# Altium PCB Electrode_PCB_v4.0.3.PcbDoc
Units mil, origin at the board's own origin, x right, y up, seen from the top; angles counter-clockwise.
Board outline 510.49 x 1258.83 mil, 2 copper layers (Top Layer, Bottom Layer), stack 34 mil thick; 40 components, 29 nets, 104 pads, 31 vias.
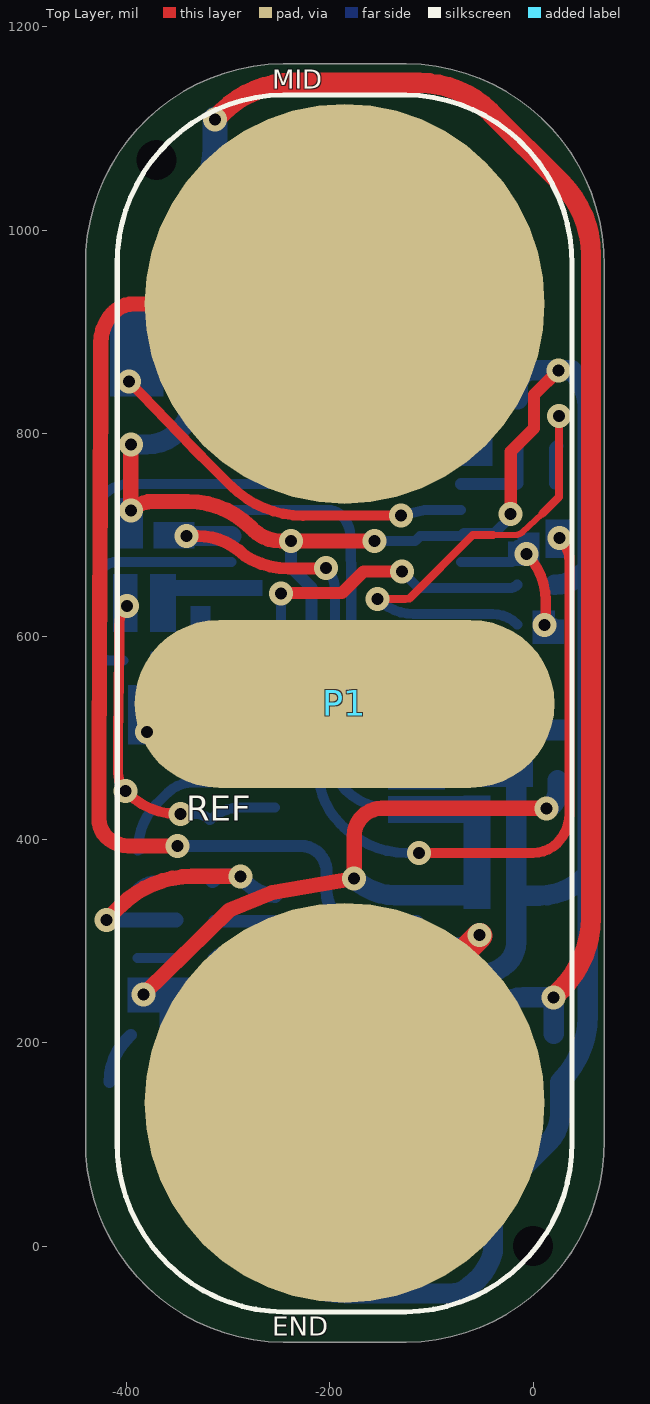
[diagram p0: Top Layer view]
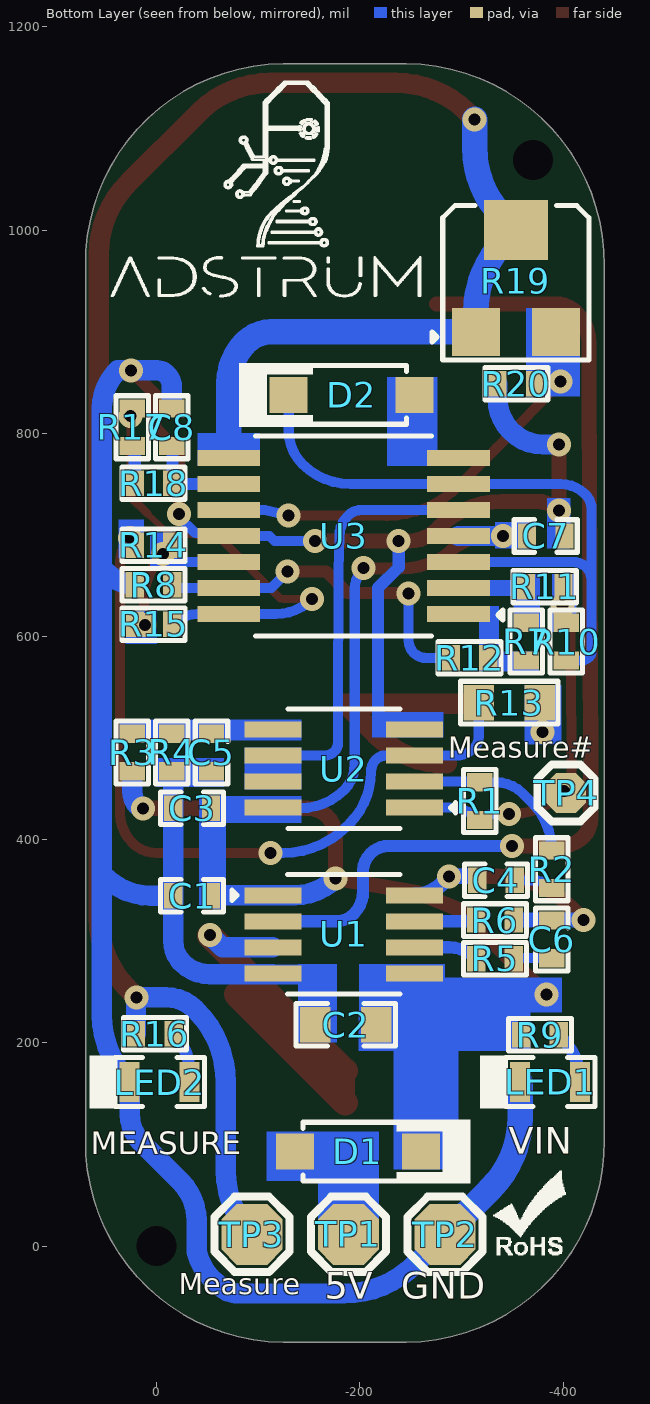
[diagram p1: Bottom Layer view, seen from below]
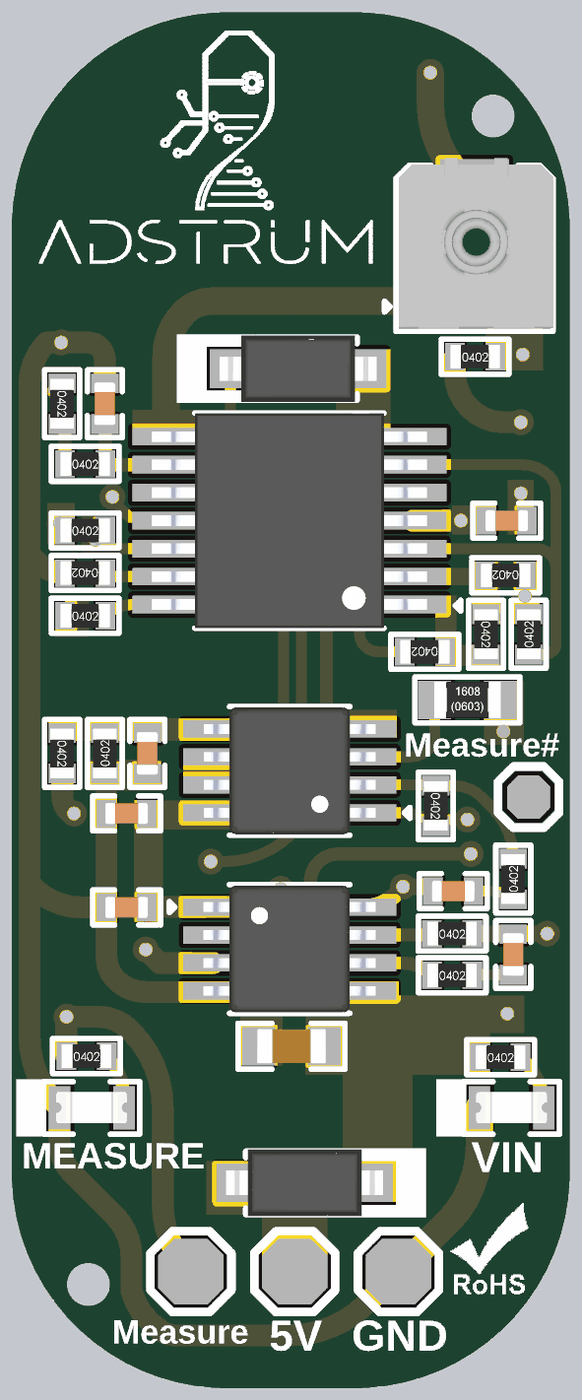
[diagram p2: 3D render of the assembled board from below, using the file's embedded part models]

## Layer stack, top to bottom
Top Solder: solder mask 3, Solder Resist, Dk 3.5
Top Layer: signal copper 9
Dielectric 1: dielectric 16, FR-4, Dk 4.8
Bottom Layer: signal copper 9
Bottom Solder: solder mask 3, Solder Resist, Dk 3.5

## Board outline
-440.49,104.27 ccw(c-243.65,102.06) -245.86,-94.78 -124.63,-94.78 ccw(c-126.84,102.06) 70,104.27 70,965 ccw(c-126.84,967.21) -124.63,1164.05 -245.86,1164.05 ccw(c-243.65,967.21) -440.49,965

## Design rules (kind name [scope] priority, off if disabled: settings)
Clearance [All] p1: gap=6 ignorepadtopadclearanceinfootprint=FALSE except(4: Arc-SMDPad Track-SMDPad SMDPad-SMDPad)
ComponentClearance [All] p1: gap=5 collisioncheckmode=3 verticalgap=5 showdistances=FALSE
HoleSize [All] p1: absolutevalues=TRUE maxlimit=1000 minlimit=1 maxpercent=80.000 minpercent=20.000
HoleToHoleClearance [All] p1: gap=0 allowstackedmicrovias=TRUE
MinimumSolderMaskSliver [All] p1: minsoldermaskwidth=0
PolygonConnect [All] p1: connectstyle=Relief reliefconductorwidth=10 reliefentries=4 polygonreliefangle="90 Angle" airgapwidth=10
RoutingVias [All] p1: holewidth=11.81 width=23.62 viastyle="Through Hole" minholewidth=11.81 minwidth=23.62 maxholewidth=31.5 maxwidth=62.99
SilkToSilkClearance [All] p1: silktosilkclearance=0
SilkToSolderMaskClearance [IsPad] p1: minsilkscreentomaskgap=0 clearancetoexposedcopper=TRUE
SolderMaskExpansion [All] p1: expansion=4 istentingtop=FALSE
UnRoutedNet [All] p1: checkbadconnections=TRUE
Width [All] p1: maxlimit=40 minlimit=6 preferedwidth=22 minimp=50.000000 maximp=50.000000 favimp=50.000000
23 further rules are at their usual default settings.

## Components (designator, comment, footprint, x,y, rotation, side; value= is the part's Value field where it differs from the comment)
C1 "0.1uF" Cap-0402 -35,345 r0 bottom locked
C2 "10uF" Cap-0603 -186,218 r0 bottom locked
C3 "0.1uF" Cap-0402 -35,431 r0 bottom locked
C4 "22nF" Cap-0402 -334,360 r180 bottom locked
C5 "0.1uF" Cap-0402 -54,486 r90 bottom locked
C6 "2.2nF" Cap-0402 -389,302 r270 bottom locked
C7 "0.1uF" Cap-0402 -383,699 r180 bottom locked
C8 "22nF" Cap-0402 -15,806 r90 bottom locked
D1 "1N4148W" SOD-123 -198,93 r180 bottom locked
D2 "1N4148W" SOD-123 -192,838 r0 bottom
LED1 "RED" LED-0603 -387.37,161.57 r0 bottom locked
LED2 "Emerald" LED-0603 -3,161.57 r0 bottom locked
P1 "SEMG Sensor" sEMG-sensor -185.49,534.27 r0 top locked
R1 "330K" Res-0402 -318,438 r270 bottom value=330kR
R2 "330K" Res-0402 -389,371 r90 bottom locked value=330kR
R3 "200K" Res-0402 24,486 r270 bottom locked
R4 "200K" Res-0402 -15,486 r90 bottom locked
R5 "1K" Res-0402 -333,283 r180 bottom locked
R6 "200K" Res-0402 -333,321 r180 bottom locked
R7 "10K" Res-0402 -364,595 r270 bottom locked
R8 "10K" Res-0402 3,651 r0 bottom locked
R9 "330R" Res-0402 -377.25,208 r180 bottom locked
R10 "10K" Res-0402 -403,595 r90 bottom locked
R11 "10K" Res-0402 -382,649 r0 bottom locked
R12 "10K" Res-0402 -308,579 r0 bottom locked
R13 "0.3R" Res-0603 -347,535 r0 bottom value=300mR
R14 "10K" Res-0402 3,690 r180 bottom locked
R15 "10K" Res-0402 3,612 r180 bottom locked
R16 "330R" Res-0402 1.75,209 r180 bottom locked
R17 "1M" Res-0402 24,806 r270 bottom locked value=1MR
R18 "1M" Res-0402 3,751 r180 bottom locked value=1MR
R19 "TC33X-2-104E" TC33X-2-104E_ -314.13,899.91 r180 bottom locked
R20 "1K" Res-0402 -354,849 r180 bottom locked
TP1 "TEST POINT" Test-point#1 -188.85,11.71 r180 bottom locked
TP2 "TEST POINT" Test-point#1 -283.85,11.71 r180 bottom locked
TP3 "TEST POINT" Test-point#1 -93.85,11.71 r180 bottom locked
TP4 "Test Point" Test-point#2 -403,446 r180 bottom
U1 "AD8237ARMZ-R7" MSOP-8 -184.18,307 r180 bottom locked
U2 "AD8617ARMZ-REEL" MSOP-8 -184.26,470 r0 bottom locked
U3 "AD8619ARUZ-REEL" 14-TSSOP -184,699 r0 bottom locked

## Footprints (in the part's own frame and the unit in brackets; to place one, negate y for a bottom-side part, rotate by r counter-clockwise, add the part's x,y. Pads: shape width x height; smd on the part's side, far side on the other; paste and mask are expansions set on the pad)
14-TSSOP [mm]
  rect 1.57x0.41 smd: 1(-2.87,1.95) 2(-2.87,1.3) 3(-2.87,0.65) 4(-2.87,0) 5(-2.87,-0.65) 6(-2.87,-1.3) 7(-2.87,-1.95) 8(2.87,-1.95) 9(2.87,-1.3) 10(2.87,-0.65) 11(2.87,0) 12(2.87,0.65) 13(2.87,1.3) 14(2.87,1.95)
  silkscreen extent -3.98,-2.5 2.2,2.5, body extent -3.2,-2.5 3.2,2.5, height 1.2
Cap-0402 [mil]
  rect 18x25 smd mask+2.36: 1(-18.5,0) 2(18.5,0)
  silkscreen extent -31,-16 31,16, body extent -20,-10 20,10, height 19
Cap-0603 [mil]
  rect 30x35 smd mask+2.36: 1(-30,0) 2(30,0)
  silkscreen extent -49,-21 49,21, body extent -32,-16 31,16, height 34
LED-0603 [mm]
  rect 0.5x1 smd: 1(-0.75,0) 2(0.75,0)
  silkscreen extent -1.12,-0.66 1.75,0.66, body extent -0.82,-0.37 0.82,0.36, height 0.68
MSOP-8 [mm]
  rect 1.42x0.4 smd: 1(-1.77,0.975) 2(-1.77,0.325) 3(-1.77,-0.325) 4(-1.77,-0.975) 5(1.77,-0.975) 6(1.77,-0.325) 7(1.77,0.325) 8(1.77,0.975)
  silkscreen extent -2.8,-1.5 1.4,1.5, body extent -2,-1.47 2,1.47, height 1.3
Res-0402 [mil]
  rect 18x25 smd mask+2.17: 1(-18.5,0) 2(18.5,0)
  silkscreen extent -32,-17 32,16, body extent -23,-11 23,11, height 16
Res-0603 [mil]
  rect 30x35 smd: 1(-30,0) 2(30,0)
  silkscreen extent -48,-21 48,21, body extent -31,-17 31,17, height 18
sEMG-sensor [mm]
  round 10 smd: 1(0,9.987) 2(0,-9.987)
  oval 10.5x4.2 smd: 3(0,-0.013)
  silkscreen extent -5.68,-15.21 5.68,15.21
SOD-123 [mm]
  rect 0.95x0.9 smd: 1(-1.575,0) 2(1.575,0)
  silkscreen extent -1.37,-0.8 2.82,0.8, body extent -1.82,-0.77 1.83,0.78, height 1.5
TC33X-2-104E_ [mm]
  rect 1.2x1.2 smd: 1(0,0) 3(2,0)
  rect 1.6x1.5 smd: 2(1,2.55)
  silkscreen extent -1.09,-0.71 2.83,3.15, body extent -0.76,-0.64 2.84,3.32, height 1.13
Test-point#1 [mil]
  oct 60x60 smd: 1(0,0)
  silkscreen extent -37,-37 37,37
Test-point#2 [mil]
  oct 39.37x39.37 smd: 1(0,0)
  silkscreen extent -28,-28 28,28

## Part data
C1 C3 C5 C7: library part C1005X5R1H104K050BB, "CAP CER 0.1UF 50V X5R 0402", Capacitance=100nF, Case Code (Imperial)=0402, Case Code (Metric)=1005, Dielectric=X5R, Dielectric Material=Ceramic, LCSC Part Number=C2181865, MANUFACTURER=TDK, Max Operating Temperature=85°C, Min Operating Temperature=-55°C, Package Quantity=1, Supplier Part Number 1=445-5942-1-ND, Tolerance=10%, Voltage=50V, Case/Package=0402, ComponentLink1Description=https://product.tdk.com/info/en/catalog/spec/mlccspec_commercial_general_midvoltage_en.pdf?src-supplier=Digi-Key, ComponentLink1URL=https://product.tdk.com/info/en/catalog/spec/mlccspec_commercial_general_midvoltage_en.pdf?src-supplier=Digi-Key, ComponentLink2Description=http://www.tdk.co.jp/tefe02/e413_c.pdf?src-supplier=Future+Electronics, ComponentLink2URL=http://www.tdk.co.jp/tefe02/e413_c.pdf?src-supplier=Future+Electronics, ComponentLink3Description=https://www.verical.com/server-webapp/html/getDatasheet?partID=743571&src-supplier=Verical, ComponentLink3URL=https://www.verical.com/server-webapp/html/getDatasheet?partID=743571&src-supplier=Verical, ComponentLink4Description=http://www.tdk.co.jp/tefe02/e412_c.pdf?src-supplier=Avnet+Europe, ComponentLink4URL=http://www.tdk.co.jp/tefe02/e412_c.pdf?src-supplier=Avnet+Europe, Construction=Flat, Depth=0.5mm, Height=0.5mm, Item Type=Capacitor, Lead Free="Lead Free", Length=1mm, Manufacturer Part Number=C1005X5R1H104K050BB, Mount="Surface Mount", Packaging="Tape and Reel", Pricing 1="1=0.12, 10=0.09, 50=0.049, 100=0.04, 500=0.02858, 1000=0.02245, 2500=0.02041, 5000=0.01878 (USD)", Radiation Hardening=No, REACH SVHC="No SVHC", Resistor Type=Ceramic, RoHS Compliant=Yes, Series=C, Stock 1=1455182, Supplier 1=Digi-Key, Termination=SMD/SMT, Thickness=0.022inch, Voltage Rating=50V, Voltage Rating (DC)=50V, Weight=2.3E-05oz, Width=0.02inch
C2: library part GRM188R6YA106MA73D, "10uF 35V X5R 20% Pad SMD 0603", Case Code (Imperial)=0603, Case Code (Metric)=1608, Dielectric=X5R, LCSC Part Number=C194427, MANUFACTURER=Murata, Max Operating Temperature=85°C, Min Operating Temperature=-55°C, Tolerance=20%, Voltage Rating=35V, Capacitance=10uF, Case/Package=0603, Category="Ceramic Capacitors", ComponentLink1Description=http://search.murata.co.jp/Ceramy/image/img/A01X/G101/ENG/GRM188R6YA106MA73-01.pdf?src-supplier=Future+Electronics, ComponentLink1URL=http://search.murata.co.jp/Ceramy/image/img/A01X/G101/ENG/GRM188R6YA106MA73-01.pdf?src-supplier=Future+Electronics, ComponentLink2Description=http://search.murata.co.jp/Ceramy/image/img/A01X/G101/ENG/GRM188R6YA106MA73-01.pdf?src-supplier=Digi-Key, ComponentLink2URL=http://search.murata.co.jp/Ceramy/image/img/A01X/G101/ENG/GRM188R6YA106MA73-01.pdf?src-supplier=Digi-Key, ComponentLink3Description=https://www.murata.com/~/media/webrenewal/support/library/catalog/products/capacitor/mlcc/c02e.ashx?la=en-us&src-supplier=Digi-Key, ComponentLink3URL=https://www.murata.com/~/media/webrenewal/support/library/catalog/products/capacitor/mlcc/c02e.ashx?la=en-us&src-supplier=Digi-Key, ComponentLink4Description=http://search.murata.co.jp/Ceramy/image/img/A01X/G101/ENG/GRM188R6YA106MA73-01.pdf?src-supplier=Mouser, ComponentLink4URL=http://search.murata.co.jp/Ceramy/image/img/A01X/G101/ENG/GRM188R6YA106MA73-01.pdf?src-supplier=Mouser, ComponentLink5Description=http://search.murata.co.jp/Ceramy/image/img/A01X/G101/ENG/GRM188R6YA106MA73-01.pdf?src-supplier=TTI, ComponentLink5URL=http://search.murata.co.jp/Ceramy/image/img/A01X/G101/ENG/GRM188R6YA106MA73-01.pdf?src-supplier=TTI, Length=0.063inch, Manufacturer Part Number=GRM188R6YA106MA73D, Mount="Surface Mount", Packaging="Tape and Reel", Pricing 1="1=0.36650, 10=0.23380, 25=0.23160, 100=0.15050, 250=0.14890, 500=0.10700, 1000=0.09270, 3000=0.08640, 6000=0.07720, 15000=0.07140, 30000=0.05840 (USD)", RoHS=Yes, RoHS Compliant=Yes, Stock 1=37601, Supplier 1="Arrow Electronics", Supplier Part Number 1=GRM188R6YA106MA73D, Thickness=0.039inch, Voltage Rating (DC)=35V, Width=0.031inch
C4: library part CC0402KRX5R7BB223, "CAP CER 0.022UF 16V X5R 0402", Case Code (Imperial)=0402, Case Code (Metric)=1005, Dielectric=X5R, LCSC Part Number=C541399, MANUFACTURER=Yageo, Max Operating Temperature=85°C, Min Operating Temperature=-55°C, Supplier Part Number 1=603-CC402KRX5R7BB223, Tolerance=10%, Voltage Rating=16V, Capacitance=22nF, Case/Package=0402, Category="Ceramic Capacitors", ComponentLink1Description=http://www.yageo.com/exep/pages/download/literatures/ProductSelectionGuide%202014_Final_2.pdf?src-supplier=Digi-Key, ComponentLink1URL=http://www.yageo.com/exep/pages/download/literatures/ProductSelectionGuide%202014_Final_2.pdf?src-supplier=Digi-Key, ComponentLink2Description=http://www.yageo.com/documents/recent/UPY-GPHC_X5R_4V-to-50V_25.pdf?src-supplier=Digi-Key, ComponentLink2URL=http://www.yageo.com/documents/recent/UPY-GPHC_X5R_4V-to-50V_25.pdf?src-supplier=Digi-Key, Halogen Free="Halogen Free", Lead Free="Lead Free", Length=0.039inch, Manufacturer Part Number=CC0402KRX5R7BB223, Mount="Surface Mount", Packaging="Tape and Reel", Pricing 1="1=0.10000, 10=0.05600, 50=0.05600, 100=0.02500, 1000=0.01400, 10000=0.01000 (USD)", RoHS=Yes, RoHS Compliant=Yes, Stock 1=31160, Supplier 1=Mouser, Thickness=0.022inch, Voltage Rating (DC)=16V, Width=0.02inch
C6: library part 04025C222JAT2A, "CAP CER 2.2nF 50V X7R ±5% 0402 MLCC - SMD/SMT ROHS", LCSC Part Number=C597041, MANUFACTURER="Kyocera AVX", Package=0402, ComponentLink1Description=LCSC, ComponentLink1URL=https://www.lcsc.com/product-detail/Multilayer-Ceramic-Capacitors-MLCC-SMD-SMT_Kyocera-AVX-04025C222JAT2A_C597041.html, Item Type=Capacitor, Manufacturer Part Number=04025C222JAT2A
C8: library part CC0402JRX7R7BB223, "CAP CER 0.022UF 16V X7R 0402", Case Code (Imperial)=0402, Case Code (Metric)=1005, Dielectric=X7R, LCSC Part Number=C541459, MANUFACTURER=Yageo, Max Operating Temperature=125°C, Min Operating Temperature=-55°C, Supplier Part Number=311-3758-1-ND, Tolerance=5%, Voltage Rating=16V, Case/Package=0402, Category="Ceramic Capacitors", ComponentLink1Description=https://datasheet.ciiva.com/13264/upy-gphc-x7r-6-3v-to-50v-8-12304-13264039.pdf?src-supplier=Mouser, ComponentLink1URL=https://datasheet.ciiva.com/13264/upy-gphc-x7r-6-3v-to-50v-8-12304-13264039.pdf?src-supplier=Mouser, Halogen Free=5694HalogenFree, Item Type=Capacitor, Lead Free=5697LeadFree, Length=0.039inch, Manufacturer Part Number=CC0402JRX7R7BB223, Mounting Technology="Surface Mount", Packaging="Tape and Reel", Pricing="1=0.1, 10=0.033, 50=0.0192, 100=0.0149, 500=0.0112, 1000=0.0088, 2500=0.008, 5000=0.00736 (USD)", RoHS=Yes, RoHS Compliant=Yes, Series=CC, Stock=4203, Supplier=Digikey, Termination=SMD/SMT, Thickness=0.022inch, Voltage Rating (DC)=16V, Weight=2.3E-05oz, Width=0.5mm
D1 D2: "100V 400mW Single 1.25V@150mA 8ns 300mA SOD-123 Switching Diode ROHS", LCSC Part Number=C917030, MANUFACTURER=JSMSEMI, Package=SOD-123, ComponentLink1Description=LCSC, ComponentLink1URL=https://www.lcsc.com/product-detail/Switching-Diode_JSMSEMI-1N4148W_C917030.html, Item Type=Diode, Manufacturer Part Number=1N4148W
LED1: library part NCD0603R3, "RED LED 0603 Light Emitting Diodes", LCSC Part Number=C3151730, MANUFACTURER="Foshan NationStar Optoelectronics", Package=0603, ComponentLink1Description=LCSC, ComponentLink1URL=https://www.lcsc.com/product-detail/Light-Emitting-Diodes-LED_Foshan-NationStar-Optoelectronics-NCD0603R3_C3151730.html, Item Type=LED, Manufacturer Part Number=NCD0603R3
LED2: library part NCD0603G2, "Emerald 0603 Light Emitting Diodes (LED) ROHS", LCSC Part Number=C87326, MANUFACTURER="Foshan NationStar Optoelectronics", Package=0603, ComponentLink1Description=LCSC, ComponentLink1URL=https://www.lcsc.com/product-detail/Light-Emitting-Diodes-LED_Foshan-NationStar-Optoelectronics-NCD0603G2_C87326.html, Item Type=LED, Manufacturer Part Number=NCD0603G2
P1: "Sensor Connecting Pads"
R1 R2: library part CRCW0402330KFKEDC, "RES 330K OHM 1% 1/16W 0402", Case/Package=0402, LCSC Part Number=C3009051, MANUFACTURER=Vishay, Power Rating=63mW, Supplier Part Number=71-CRCW0402330KFKEDC, Tolerance=1%, Category="Chip SMD Resistors", Item Type=Resistor, Lead Free="Lead Free", Manufacturer Part Number=CRCW0402330KFKEDC, Pricing="1=0.1, 10=0.017, 50=0.017, 100=0.008, 1000=0.005, 10000=0.004 (USD)", RoHS=Yes, RoHS Compliant=Yes, Stock=34154, Supplier=Mouser
R3 R4 R6: library part RC0402DR-07200KL, "RES 200K OHM 0.5% 1/16W 0402", Case/Package=0402, LCSC Part Number=C138077, MANUFACTURER=Yageo, Max Operating Temperature=155°C, Max Power Dissipation=63mW, Min Operating Temperature=-55°C, Resistance=200kR, Resistor Type="Thick Film", Supplier Part Number 1=603-RC0402DR-07200KL, Temperature Coefficient=100ppm/°C, Tolerance=0.5%, Category="Chip SMD Resistors", ComponentLink1Description=http://www.yageo.com.tw/exep/pages/download/literatures/PYu-R_INT-thick_7.pdf?src-supplier=Digi-Key, ComponentLink1URL=http://www.yageo.com.tw/exep/pages/download/literatures/PYu-R_INT-thick_7.pdf?src-supplier=Digi-Key, Features="Moisture Resistant", Height=0.016inch, Length=0.039inch, Manufacturer Part Number=RC0402DR-07200KL, Number of Terminations=2, Packaging="Tape and Reel", Pricing 1="1=0.13000, 10=0.07000, 50=0.07000, 100=0.02900, 1000=0.01300, 10000=0.00700 (USD)", RoHS=Yes, Supplier 1=Mouser, Width=0.02inch
R5 R20: library part RC0402FR-071KL, "RES 1K OHM 1% 1/16W 0402", Case Code (Imperial)=0402, Case Code (Metric)=1005, LCSC Part Number=C106235, MANUFACTURER=Yageo, Max Operating Temperature=155°C, Max Power Dissipation=63mW, Min Operating Temperature=-55°C, Power Rating=62.5mW, Resistance=1kR, Resistance Tolerance=1%, Resistor Type="Thick Film", Temperature Coefficient=100ppm/°C, Voltage Rating=50V, Case/Package=0402, Category="Chip SMD Resistors", ComponentLink1Description=https://datasheet.ciiva.com/11819/0900766b80c66297-11819477.pdf?src-supplier=RSComponents, ComponentLink1URL=https://datasheet.ciiva.com/11819/0900766b80c66297-11819477.pdf?src-supplier=RSComponents, ComponentLink2Description=https://datasheet.ciiva.com/7983/1018594-7983502.pdf?src-supplier=Element14, ComponentLink2URL=https://datasheet.ciiva.com/7983/1018594-7983502.pdf?src-supplier=Element14, ComponentLink3Description=https://datasheet.ciiva.com/22747/1018594-22747513.pdf?src-supplier=Element14, ComponentLink3URL=https://datasheet.ciiva.com/22747/1018594-22747513.pdf?src-supplier=Element14, ComponentLink4Description=https://datasheet.ciiva.com/12666/pyu-rc0402-51-rohs-l-6-r-12666741.pdf?src-supplier=Mouser, ComponentLink4URL=https://datasheet.ciiva.com/12666/pyu-rc0402-51-rohs-l-6-r-12666741.pdf?src-supplier=Mouser, ComponentLink5Description=https://datasheet.ciiva.com/7849/1018594-7849869.pdf?src-supplier=Element14, ComponentLink5URL=https://datasheet.ciiva.com/7849/1018594-7849869.pdf?src-supplier=Element14, ComponentLink6Description=https://datasheet.ciiva.com/7849/1018594-7849871.pdf?src-supplier=Element14, ComponentLink6URL=https://datasheet.ciiva.com/7849/1018594-7849871.pdf?src-supplier=Element14, ComponentLink7Description=https://datasheet.ciiva.com/17063/pyu-rc0402-51-rohs-l-6-r-17063193.pdf?src-supplier=Future+Electronics, ComponentLink7URL=https://datasheet.ciiva.com/17063/pyu-rc0402-51-rohs-l-6-r-17063193.pdf?src-supplier=Future+Electronics, Construction=Rectangular, Depth=0.5mm, Features="Moisture Resistant", Height=0.32mm, Item Type=Resistor, Lead Free="Lead Free", Length=1mm, Manufacturer Part Number=RC0402FR-071KL, Military Standard=Not, Number of Pins=2, Number of Terminations=2, Packaging="Tape and Reel", Pricing 1="10000=0.00085, 20000=0.00087, 40000=0.00084, 60000=0.00083, 80000=0.00079, 100000=0.00078, 1000000=0.00076 (USD)", Reach SVHC Compliant=Yes, RoHS=Yes, RoHS Compliant=Yes, Series=RC, Size Code=0402, Stock 1=13030000, Supplier 1=Avnet, Supplier Part Number 1=RC0402FR-071KL, Technology="THICK FILM", Termination=SMD/SMT, Tolerance=1%, Voltage Rating (DC)=50V, Width=0.5mm
R7 R8 R10 R11 R12 R14 R15: library part RC0402FR-0710KL, "RES 10K OHM 1% 1/16W 0402", Case Code (Imperial)=0402, Case Code (Metric)=1005, LCSC Part Number=C60490, MANUFACTURER=Yageo, Max Operating Temperature=155°C, Max Power Dissipation=63mW, Min Operating Temperature=-55°C, Power Rating=62.5mW, Resistance=10kR, Resistance Tolerance=1%, Resistor Type="Thick Film", Supplier Part Number 1=603-RC0402FR-0710KL, Temperature Coefficient=100ppm/°C, Voltage Rating=50V, Case/Package=0402, Category="Chip SMD Resistors", ComponentLink1Description=https://datasheet.ciiva.com/7660/38568-7660787.pdf?src-supplier=Element14, ComponentLink1URL=https://datasheet.ciiva.com/7660/38568-7660787.pdf?src-supplier=Element14, ComponentLink2Description=https://datasheet.ciiva.com/7849/1686128-7849814.pdf?src-supplier=Element14, ComponentLink2URL=https://datasheet.ciiva.com/7849/1686128-7849814.pdf?src-supplier=Element14, ComponentLink3Description=https://datasheet.ciiva.com/7983/1018594-7983486.pdf?src-supplier=Element14, ComponentLink3URL=https://datasheet.ciiva.com/7983/1018594-7983486.pdf?src-supplier=Element14, ComponentLink4Description=https://datasheet.ciiva.com/22747/1018594-22747512.pdf?src-supplier=Element14, ComponentLink4URL=https://datasheet.ciiva.com/22747/1018594-22747512.pdf?src-supplier=Element14, ComponentLink5Description=https://datasheet.ciiva.com/12667/pyu-rc0402-51-rohs-l-6-r-12667067.pdf?src-supplier=Mouser, ComponentLink5URL=https://datasheet.ciiva.com/12667/pyu-rc0402-51-rohs-l-6-r-12667067.pdf?src-supplier=Mouser, ComponentLink6Description=https://datasheet.ciiva.com/7849/1784430-7849813.pdf?src-supplier=Element14, ComponentLink6URL=https://datasheet.ciiva.com/7849/1784430-7849813.pdf?src-supplier=Element14, ComponentLink7Description=https://datasheet.ciiva.com/7849/1784430-7849815.pdf?src-supplier=Element14, ComponentLink7URL=https://datasheet.ciiva.com/7849/1784430-7849815.pdf?src-supplier=Element14, Construction=Rectangular, Depth=0.5mm, Features="Moisture Resistant", Height=0.32mm, Item Type=Resistor, Lead Free="Lead Free", Lead Pitch=0.2mm, Length=1mm, Manufacturer Part Number=RC0402FR-0710KL, Military Standard=Not, Number of Pins=2, Number of Terminations=2, Packaging="Tape and Reel", Pricing 1="1=0.10000, 10=0.01400, 50=0.01400, 100=0.00500, 1000=0.00300, 10000=0.00200 (USD)", REACH SVHC="No SVHC", RoHS=Yes, RoHS Compliant=Yes, Series=RC, Stock 1=18648329, Supplier 1=Mouser, Termination=SMD/SMT, Tolerance=1%, Voltage Rating (DC)=50V, Width=0.5mm, Working Voltage=50V
R9 R16: library part RC0402FR-070RL, "RES 0 OHM JUMPER 1/16W 0402", Case Code (Imperial)=0402, Case Code (Metric)=1005, LCSC Part Number=C106231, MANUFACTURER=Yageo, Max Operating Temperature=155°C, Max Power Dissipation=63mW, Min Operating Temperature=-55°C, Power Rating=62.5mW, Resistance=0R, Resistor Type="Thick Film", Supplier Part Number 1=603-RC0402FR-070RL, Temperature Coefficient=200ppm/°C, Tolerance=1%, Voltage Rating=50V, Case/Package=0402, ComponentLink1Description=https://datasheet.ciiva.com/8896/pyu-rc0402-51-rohs-l-6-8896149.pdf?src-supplier=Avnet, ComponentLink1URL=https://datasheet.ciiva.com/8896/pyu-rc0402-51-rohs-l-6-8896149.pdf?src-supplier=Avnet, ComponentLink2Description=https://datasheet.ciiva.com/16790/pyu-rc0402-51-rohs-l-6-r-16790444.pdf?src-supplier=Future+Electronics, ComponentLink2URL=https://datasheet.ciiva.com/16790/pyu-rc0402-51-rohs-l-6-r-16790444.pdf?src-supplier=Future+Electronics, Contact Plating=Tin,Matte, Features="Moisture Resistant", Height=0.35mm, Item Type=Resistors, Lead Free="Lead Free", Length=1mm, Manufacturer Part Number=RC0402FR-070RL, Mount="Surface Mount", Number of Terminations=2, Packaging="Tape and Reel", Pricing 1="1=0.10000, 10=0.01400, 50=0.01400, 100=0.00600, 1000=0.00300, 5000=0.00200, 10000=0.00100 (USD)", Radiation Hardening=No, RoHS=Yes, RoHS Compliant=Yes, Series=RC, Size Code=0402, Stock 1=8556842, Supplier 1=Mouser, Termination=SMD/SMT, Width=0.5mm
R13: library part RL0603FR-070R3L, "RES 0.3 OHM 1% 1/10W 0603", Case/Package=0603, MANUFACTURER=Yageo, Max Operating Temperature=155°C, Max Power Dissipation=100mW, Min Operating Temperature=-55°C, Supplier Part Number=13-RL0603FR-070R3LCT-ND, Temperature Coefficient=800ppm/°C, Tolerance=1%, ComponentLink1Description=http://www.mouser.com/ds/2/447/PYu-RL_521_RoHS_L_5-2927.pdf?src-supplier=Mouser, ComponentLink1URL=http://www.mouser.com/ds/2/447/PYu-RL_521_RoHS_L_5-2927.pdf?src-supplier=Mouser, ComponentLink2Description=http://www.yageo.com/documents/recent/PYu-RL_Group_521_RoHS_L_2.pdf?src-supplier=Digikey, ComponentLink2URL=http://www.yageo.com/documents/recent/PYu-RL_Group_521_RoHS_L_2.pdf?src-supplier=Digikey, Features="Moisture Resistant", Height=0.022inch, Item Type=Resistor, Length=0.063inch, Manufacturer Part Number=RL0603FR-070R3L, Number of Terminations=2, Packaging="Tape and Reel", Pricing="1=0.24, 10=0.125, 50=0.0854, 100=0.0736, 500=0.054, 1000=0.04784 (USD)", RoHS=Yes, RoHS Compliant=Yes, Series=RL, Stock=13643, Supplier=Digikey, Width=0.031inch
R17 R18: library part RC0402FR-071ML, "RES 1M OHM 1% 1/16W 0402", Case Code (Imperial)=0402, Case Code (Metric)=1005, LCSC Part Number=C138033, MANUFACTURER=Yageo, Max Operating Temperature=155°C, Max Power Dissipation=63mW, Min Operating Temperature=-55°C, Resistance Tolerance=1%, Resistor Type="Thick Film", Supplier Part Number=311-1.00MLRCT-ND, Temperature Coefficient=100ppm/°C, Voltage Rating=50V, Case/Package=0402, Category="Chip SMD Resistors", ComponentLink1Description=https://datasheet.ciiva.com/11808/0900766b80c66297-11808125.pdf?src-supplier=Rs, ComponentLink1URL=https://datasheet.ciiva.com/11808/0900766b80c66297-11808125.pdf?src-supplier=Rs, ComponentLink2Description=https://datasheet.ciiva.com/46394/1018594-46394951.pdf?src-supplier=Element14, ComponentLink2URL=https://datasheet.ciiva.com/46394/1018594-46394951.pdf?src-supplier=Element14, ComponentLink3Description=https://datasheet.ciiva.com/7849/1018594-7849883.pdf?src-supplier=Element14, ComponentLink3URL=https://datasheet.ciiva.com/7849/1018594-7849883.pdf?src-supplier=Element14, ComponentLink4Description=https://datasheet.ciiva.com/7849/1018594-7849882.pdf?src-supplier=Element14, ComponentLink4URL=https://datasheet.ciiva.com/7849/1018594-7849882.pdf?src-supplier=Element14, ComponentLink5Description=https://datasheet.ciiva.com/16741/pyu-rc0402-51-rohs-l-6-r-16741081.pdf?src-supplier=Future+Electronics, ComponentLink5URL=https://datasheet.ciiva.com/16741/pyu-rc0402-51-rohs-l-6-r-16741081.pdf?src-supplier=Future+Electronics, Construction=Rectangular, Depth=0.5mm, Features="Moisture Resistant", Height=0.32mm, Item Type=Resistor, Lead Free=5697LeadFree, Length=1mm, Manufacturer Part Number=RC0402FR-071ML, Military Standard=Not, Number of Terminations=2, Packaging="Tape and Reel", Power Rating=63mW, Pricing="1=0.1, 10=0.015, 50=0.0088, 100=0.0073, 500=0.00488, 1000=0.00417, 5000=0.00297 (USD)", Reach SVHC Compliant=Unknown, RoHS=Yes, RoHS Compliant=Yes, Series=RC, Stock=6516, Supplier=Digikey, Technology="THICK FILM", Termination=SMD/SMT, Tolerance=1%, Voltage Rating (AC)=50V
R19: "TRIMMER 100K OHM 0.1W J LEAD TOP", Color=Silver, LCSC Part Number=C719186, MANUFACTURER=Bourns, Max Operating Temperature=100°C, Max Power Dissipation=100mW, Min Operating Temperature=-40°C, Package Quantity=2500, Resistance=100kR, Resistance Tolerance=25%, Resistor Type=Carbon,Cermet, Temperature Coefficient=250ppm/°C, Voltage Rating (DC)=50V, Category="Variable Resistors and Potentiometers", ComponentLink1Description=https://datasheet.ciiva.com/11832/0900766b802749b3-11832506.pdf?src-supplier=RSComponents, ComponentLink1URL=https://datasheet.ciiva.com/11832/0900766b802749b3-11832506.pdf?src-supplier=RSComponents, ComponentLink2Description=https://datasheet.ciiva.com/8700/tc33-8700395.pdf?src-supplier=Avnet, ComponentLink2URL=https://datasheet.ciiva.com/8700/tc33-8700395.pdf?src-supplier=Avnet, ComponentLink3Description=https://datasheet.ciiva.com/2155/tc33-2155965.pdf?src-supplier=Digi-Key, ComponentLink3URL=https://datasheet.ciiva.com/2155/tc33-2155965.pdf?src-supplier=Digi-Key, ComponentLink4Description=https://datasheet.ciiva.com/7953/1818686-7953181.pdf?src-supplier=Element14, ComponentLink4URL=https://datasheet.ciiva.com/7953/1818686-7953181.pdf?src-supplier=Element14, ComponentLink5Description=https://datasheet.ciiva.com/16716/70155234-16716301.pdf?src-supplier=Allied+Electronics, ComponentLink5URL=https://datasheet.ciiva.com/16716/70155234-16716301.pdf?src-supplier=Allied+Electronics, ComponentLink6Description=https://datasheet.ciiva.com/2155/tc33-2155966.pdf?src-supplier=Digi-Key, ComponentLink6URL=https://datasheet.ciiva.com/2155/tc33-2155966.pdf?src-supplier=Digi-Key, ComponentLink7Description=https://datasheet.ciiva.com/7953/1818686-7953182.pdf?src-supplier=Element14, ComponentLink7URL=https://datasheet.ciiva.com/7953/1818686-7953182.pdf?src-supplier=Element14, ComponentLink8Description=https://datasheet.ciiva.com/2155/tc33-2155967.pdf?src-supplier=Digi-Key, ComponentLink8URL=https://datasheet.ciiva.com/2155/tc33-2155967.pdf?src-supplier=Digi-Key, Depth=3.8mm, Height=0.047inch, Item Type=Potentiometer, Length=3mm, Manufacturer Part Number=TC33X-2-104E, Military Standard=Not, Mount="Surface Mount", Number of Turns=1, Packaging="Tape and Reel", Power Rating=100mW, Pricing 1="2500=0.15500, 5000=0.13130 (USD)", Radiation Hardening=No, REACH SVHC="No SVHC", RoHS=Yes, RoHS Compliant=Yes, Series=TC33, Stock 1=12500, Supplier 1="Arrow Electronics", Supplier Part Number 1=TC33X-2-104E, Termination="Foot Print", Tolerance=25%, Weight=29.4mg, Width=0.118inch
TP1 TP2 TP3: "Test Point ON", Item Type="TEST POINT"
TP4: library part "TEST POINT", "Test Point ON", Item Type="TEST POINT"
U1: "IC INST AMP 1 CIRCUIT 8MSOP", LCSC Part Number=C12086, MANUFACTURER="Analog Devices", ComponentLink1Description=https://datasheet.ciiva.com/6626/ad8237-6626733.pdf?src-supplier=Digikey, ComponentLink1URL=https://datasheet.ciiva.com/6626/ad8237-6626733.pdf?src-supplier=Digikey, ComponentLink2Description=https://datasheet.ciiva.com/8582/ad8237-8582303.pdf?src-supplier=Avnet, ComponentLink2URL=https://datasheet.ciiva.com/8582/ad8237-8582303.pdf?src-supplier=Avnet, Item Type=IC, Manufacturer Part Number=AD8237ARMZ-R7, Pricing="1=2.88, 10=2.37, 50=2.37, 100=2.13, 1000=1.56, 10000=1.47 (USD)", RoHS=Yes, Stock=141226, Supplier=Mouser
U2: "IC CMOS 2 CIRCUIT 8MSOP", LCSC Part Number=C578787, MANUFACTURER="Analog Devices", ComponentLink1Description=https://datasheet.ciiva.com/1793/ad8613-8617-8619-1793776.pdf?src-supplier=Digikey, ComponentLink1URL=https://datasheet.ciiva.com/1793/ad8613-8617-8619-1793776.pdf?src-supplier=Digikey, ComponentLink2Description=https://datasheet.ciiva.com/1793/ad8613-8617-8619-1793777.pdf?src-supplier=Digikey, ComponentLink2URL=https://datasheet.ciiva.com/1793/ad8613-8617-8619-1793777.pdf?src-supplier=Digikey, ComponentLink3Description=https://datasheet.ciiva.com/1793/ad8613-8617-8619-1793778.pdf?src-supplier=Digikey, ComponentLink3URL=https://datasheet.ciiva.com/1793/ad8613-8617-8619-1793778.pdf?src-supplier=Digikey, Item Type=IC, Manufacturer Part Number=AD8617ARMZ-REEL, Pricing="1=2.71, 10=2.43, 50=2.43, 100=1.95, 1000=1.33, 10000=1.19 (USD)", RoHS=Yes, Stock=4553, Supplier=Mouser
U3: "IC CMOS 4 CIRCUIT 14TSSOP", Input Capacitance=2.5pF, LCSC Part Number=C653014, MANUFACTURER="Analog Devices", ComponentLink1Description=http://components.arrow.com/part/dataview/42367262S9299045N2771?src-supplier=Arrow+Electronics, ComponentLink1URL=http://components.arrow.com/part/dataview/42367262S9299045N2771?src-supplier=Arrow+Electronics, ComponentLink2Description=http://www.mouser.com/ds/2/609/AD8613_8617_8619-877840.pdf?src-supplier=Mouser, ComponentLink2URL=http://www.mouser.com/ds/2/609/AD8613_8617_8619-877840.pdf?src-supplier=Mouser, ComponentLink3Description=https://datasheet.octopart.com/AD8619ARUZ-REEL-Analog-Devices-datasheet-62341446.pdf?src-supplier=Element14, ComponentLink3URL=https://datasheet.octopart.com/AD8619ARUZ-REEL-Analog-Devices-datasheet-62341446.pdf?src-supplier=Element14, ComponentLink4Description=http://www.analog.com/static/imported-files/data_sheets/AD8613_8617_8619.pdf?src-supplier=Avnet, ComponentLink4URL=http://www.analog.com/static/imported-files/data_sheets/AD8613_8617_8619.pdf?src-supplier=Avnet, ComponentLink5Description=http://www.analog.com/media/en/technical-documentation/data-sheets/AD8613_8617_8619.pdf?src-supplier=Digikey, ComponentLink5URL=http://www.analog.com/media/en/technical-documentation/data-sheets/AD8613_8617_8619.pdf?src-supplier=Digikey, Item Type=Opam, Lead Free=5698LeadFree, Manufacturer Part Number=AD8619ARUZ-REEL, Pricing="1=3.67, 10=3.12, 50=3.12, 100=2.7, 1000=1.94, 10000=1.84 (USD)", RoHS=Yes, Stock=2210, Supplier=Mouser

## Free pads (board coordinates)
  round 0 hole 39.37 unplated: MH1(-370.49,1069.27) MH2(0,0)

## Via types
v1: diameter 23.62, hole 11.81, Top Layer to Bottom Layer, tented both sides, 30 vias
v2: diameter 23.62, hole 11.81, Top Layer to Bottom Layer, 1 vias

## Nets (pads, with @x,y where several pads share a name; then routed paths per layer and width w, separated by ;. In a path a pad name is that pad's centre, name@x,y a point inside that pad or via, vN(x,y) a via of type N, cw(c..) or ccw(c..) an arc to the next point about the centre after c; other vN are vias at no path point)
+5V: C1.1 C2.1 C3.1 C7.1 D1.2 R3.2 R9.1 U1.1 U1.5 U2.8 U3.4 | length 1164.5
  Top Layer w12: v1(-341.01,699) -330.31,699 cw(c-330.31,633.54) -296.01,689.29 cw(c-330.31,633.54) -284.02,679.83 ccw(c-240.5,747.25) -240.5,667 -203.89,667 v1(-203.61,667.28)
  Top Layer w15: v1(-383.56,247.82) -298.66,330.77 -256.59,348.03 v1(-176,362) -176,403.69 cw(c-148.69,403.69) -168,423 cw(c-148.69,403.69) -148.69,431 v1@14.19,431
  Bottom Layer w10: v1(-203.61,667.28) cw(c-224.39,646.5) -195,646.5 -195,474.05 ccw(c-159.67,474.05) -184.69,449.1 ccw(c-141.04,492.67) -140.98,431 U2.8@-113.09,431
  Bottom Layer w20: C7.1@-358.67,699 v1(-341.01,699) U3.4 ; v1(-176,362) ccw(c-135.89,402.11) -135.89,345.39 U1.1 C1.1@-62.5,345.39 ; v1@13.3,430.67 ccw(c8.47,444.87) 22.57,439.75 ccw(c0.1,447.9) 24,447.9 R3.2@24,458.5
  Bottom Layer w25: v1(-383.56,247.82) cw(c-383.56,229.56) -372.38,244 cw(c-383.56,229.56) -370.65,242.47
  other v1: 13.19,431
E: P1.2 U1.3 | length 438.5
  Top Layer w20: P1.2 P1.2@-185.49,172.51 ; v1@-52.49,305.51 v1(-52.49,306.49)
  Top Layer w25: P1.2 P1.2@-78.77,247.79 ; P1.2@-185.49,172.51 v1@-52.49,305.51
  Bottom Layer w20: U1.3 -64.77,294.2 v1(-52.49,306.49)
ENV: R16.1 R19.1 R19.2 TP3.1 U3.8 | length 2113.5
  Top Layer w20: v1(-313,1109) -306.29,1115.71 cw(c-235.58,1045) -235.58,1145 -112.1,1145 cw(c-112.1,1045) -41.39,1115.71 27.71,1046.61 cw(c-43,975.9) 57,975.9 57,323.42 cw(c-43,323.42) 27.71,252.71 v1(20,245)
  Bottom Layer w20: R19.2@-354.35,1001.51 R19.2@-334.77,1019.83 ; R19.2 R19.2@-343.42,990.22 ; R19.1 R19.1@-314.13,919.51 ; TP3.1 ccw(c-156.25,74.12) -68,74.12 -68,161.58 cw(c32,161.58) -38.71,232.29 -38,233 cw(c-9.03,204.03) -9.03,245 v1@19.02,245 ; R16.1 v1@20.25,245
  Bottom Layer w25: R19.2@-343.42,990.22 cw(c-414.13,919.51) R19.1@-314.13,919.51 ; R19.2@-334.77,1019.83 ccw(c-410.64,1081.29) -313,1081.29 v1(-313,1109) ; R19.1 -112.57,899.91 cw(c-112.57,864.92) -87.82,889.66 cw(c-128.41,849.07) -71.01,849.07 -71.01,783.84
GND: C1.2 C2.2 C3.2 C5.1 C7.2 C8.2 LED1.2 LED2.2 R4.1 R8.2 R20.1 TP2.1 U1.4 U2.4 U3.11 | length 2813.4
  Top Layer w12: -277.32,707.07 -275.54,705.29 ; v1@-248.28,694 v1(-238.23,694) ; v1(-22,720.69) -22,782.12 1,805.12 1,837.97 ccw(c-185.49,927.46) 1.03,838.03 v1(25,862)
  Top Layer w15: v1(-395.93,789) v1(-395.93,724) cw(c-374.2,702.27) -374.2,733 -339.92,733 cw(c-339.92,644.47) -277.32,707.07 ; -275.54,705.29 ccw(c-248.28,732.54) v1@-248.28,694 ; v1(-238.23,694) v1(-156,694)
  Bottom Layer w10: v1(-156,694) -116.02,694 -111.06,698.96 -71.05,698.96 U3.11 -67.94,702.07 -37.66,702.07 -22,717.73 v1(-22,720.69)
  Bottom Layer w12: U2.4@-253.56,508 U2.4 -245.61,508.39 -237.29,508.39 -233.86,508.39 -218,524.25 -218,648 -238.23,668.23 v1(-238.23,694)
  Bottom Layer w20: v1@-389,789 -380.38,789 ccw(c-380.38,833.38) -349,802 ccw(c-381.59,834.59) -335.5,834.59 R20.1 ; TP2.1 -254.86,-17.27 ccw(c-184.15,53.44) -184.15,-46.56 -79.8,-46.56 ccw(c-79.8,-22.85) -77.23,-46.42 ccw(c-79.8,-22.85) -63.03,-39.62 ccw(c-93.27,5.27) -55,-33 ccw(c-97.05,9.05) -39.43,-5.65 -39.43,24.88 cw(c15.63,24.88) -23.3,63.81 14.94,102.06 ccw(c-13.03,130.03) 26.53,130.03 LED2.2 ccw(c-39.8,227.9) 54,227.9 54,366.67 ; U1.4@-114.5,267.61 -52.49,267.61 ccw(c-52.49,306.49) -25,279 ccw(c-45.52,299.52) -16.5,299.52 ; C5.1 R4.1 ccw(c-11.38,463.88) -16.5,463.91 C3.2 C1.2 ; -16.5,300.52 C1.2 ; -15,833.5 -15,845.93 cw(c2.07,845.93) -10,858 cw(c-0.34,848.34) -0.34,862 v1(25,862) 38.26,862 ; R8.2 ccw(c21.5,688.81) 48.24,662.07 54,667.84 ; 39.89,860.3 cw(c0.27,824.01) 54,824.01 54,667.84 ; C1.2 5.64,345 ccw(c5.64,409.44) 51.21,363.87 54,366.67 ; 54,366.67 54,667.84
  Bottom Layer w25: LED1.2 -357.84,127.13 ccw(c-257.84,127.13) -328.55,56.42 TP2.1
M: P1.1 U1.2 | length 1020.4
  Top Layer w15: v1(-350,394) -398.27,394 cw(c-398.27,424.73) -420,403 cw(c-402.35,420.65) -427.31,420.65 -427.31,475.2 -425.49,845.95 -425.49,888.85 cw(c-382.85,888.85) -413,919 cw(c-392.57,898.57) -392.57,927.46 P1.1@-275.36,927.46
  Bottom Layer w12: v1(-350,394) -228.59,394 cw(c-228.59,368.54) -203.24,370.85 -203.24,349.3 ccw(c-171.7,349.3) -194,327 ccw(c-176.61,344.39) -176.61,319.8 U1.2
NetC4_2: C4.2 R2.1 | length 38.5
  Bottom Layer w10: R2.1 cw(c-370.89,334.39) -370.89,360 C4.2
NetC5_2: C5.2 R3.1 R4.2 U2.5 | length 88.4
  Bottom Layer w12: C5.2@-63.38,508.39 cw(c-63.38,495.12) C5.2 R4.2 R3.1
NetC6_2: C6.2 R5.2 | length 37.6
  Bottom Layer w10: C6.2 -352.71,283.5 cw(c-352.71,281.79) R5.2
NetC8_1: C8.1 R18.2 U3.9 | length 92.4
  Bottom Layer w12: U3.9 -17.48,750.18 ccw(c-17.48,752.98) R18.2 -15.5,786.29 cw(c-13.79,786.29) C8.1
NetD1_1: D1.1 TP1.1 | length 118.9
  Bottom Layer w40: TP1.1 -188.85,52.57 cw(c-141.57,52.57) -175,86 cw(c-158.1,69.1) -158.1,93 D1.1
NetD2_1: D2.1 U3.7
NetD2_2: D2.2 R10.1 U3.3 U3.6 | length 683.2
  Bottom Layer w10: R10.1 -417.55,576.5 cw(c-417.55,588.45) -426,580 cw(c-421.17,584.83) -428,584.83 -428,655.93 ; U3.3 -409.94,673.41 ccw(c-409.94,654.94) -423,668 ccw(c-410.93,655.93) -428,655.93 ; -143.68,769.68 ccw(c-176.71,802.71) -129.99,802.71 D2.2@-129.99,836 ; -143.68,769.68 cw(c-190.74,816.74) -190.74,750.18 U3.6 -397.42,750.18 ccw(c-397.42,715.42) -422,740 ccw(c-407.51,725.51) -428,725.51 -428,655.93
NetLED1_1: LED1.1 R9.2 | length 52.6
  Bottom Layer w12: LED1.1 cw(c-355.88,161.57) R9.2@-399.03,204.72 ; R9.2@-399.03,204.72 R9.2
NetLED2_1: LED2.1 R16.2 | length 51.6
  Bottom Layer w12: LED2.1 -32.53,170.91 cw(c21.34,170.91) R16.2
NetR1_1: R1.1 R2.2 U2.2 | length 189.9
  Bottom Layer w10: R2.2@-385.68,393.5 -381.5,393.5 R2.2 cw(c-322.98,389.5) -388.88,393.5 cw(c-322.98,389.5) -388.87,393.6 cw(c-322.98,389.5) -369.69,436.16 ; -369.66,436.19 -359.77,446.07 cw(c-334.6,420.9) -350.52,452.74 cw(c-334.6,420.9) -334.6,456.5 R1.1@-320.63,456.5 ; R1.1 R1.1@-320.63,456.5 ; U2.2 -318,457.2 -318.18,457.16 R1.1@-320.63,456.5
NetR5_1: R5.1 U1.6 | length 63.6
  Bottom Layer w12: R5.1 cw(c-287.45,255.95) -287.45,294.2 U1.6
NetR6_1: R6.1 U1.7 | length 61
  Bottom Layer w10: R6.1 ccw(c-311.59,323.91) R6.1@-311.59,319.8
  Bottom Layer w12: R6.1@-311.59,319.8 U1.7
NetR7_1: R7.1 R11.2 U3.2 | length 101.3
  Bottom Layer w10: R7.1 R11.2@-364,647.79 ; R11.2@-363.97,647.82 U3.2
NetR7_2: R7.2 R12.1 U3.1 | length 6.7
  Bottom Layer w10: R12.1@-332.54,576.5 ccw(c-332.54,585.04) R12.1
NetR8_1: R8.1 R12.2 U3.13 | length 346.6
  Top Layer w12: v1(-248.06,642.6) -247.67,643 -188,643 -167,664 v1@-129.16,664
  Bottom Layer w10: R12.2 -265.07,579 ccw(c-265.07,596.07) -253,584 ccw(c-264.92,595.92) -248.06,595.92 v1(-248.06,642.6) ; v1(-129,664) -112.82,647.82 -23.18,647.82 ccw(c-23.18,658.68) R8.1
NetR14_2: R14.2 R15.1 U3.12 | length 155.3
  Top Layer w10: v1(-6.52,681.31) cw(c-52.48,635.35) 12.52,635.33 v1@12.52,611.5
  Bottom Layer w10: U3.12 -20.59,673.41 -15.5,678.5 R14.2@-15.5,686.5 ; R14.2 R14.2@-15.5,686.5 ; R14.2@-8.52,681.31 R14.2@-15.5,686.5 ; R15.1@20,614 21.5,612.5 R15.1
  other v1: 11.52,611.5
NetR17_2: R17.2 R18.1 | length 37.5
  Bottom Layer w12: R18.1 21.5,785 R17.2
NetR19_3: R19.3 R20.2 U3.10 | length 380
  Top Layer w10: v1(-397.57,851) -335.53,786.53 cw(c-342.74,779.6) -335.49,786.49 -335.44,786.43 ccw(c-185.49,927.46) -326.6,777.59 ; -326.57,777.56 ccw(c-185.49,927.46) -326.51,777.5 ; -326.49,777.49 cw(c-333.36,770.22) -326.31,777.32 -297.29,748.29 ccw(c-226.58,819) -226.58,719 v1(-130.04,719.1)
  Bottom Layer w10: R19.3@-392.87,898.17 R19.3 ; v1(-130.04,719.1) -106.52,724.59 U3.10
"OUT B": U2.6 U2.7 U3.5 | length 434.7
  Bottom Layer w10: U3.5 -201.75,724.59 cw(c-201.75,705.5) -188.25,719 cw(c-208.45,698.8) -179.89,698.8 -179,665.3 -178.5,527.15 -178.5,495.52 ccw(c-166.36,495.52) -178.38,493.81 ccw(c-166.36,495.52) -178.04,492.24 ccw(c-166.36,495.52) -174.94,486.94 ccw(c-164.85,497.15) -164.85,482.8 U2.6 cw(c-116.49,484.72) U2.6@-116.49,482
  Bottom Layer w12: U2.7 U2.6
RAW-OUTPUT: R1.2 R10.2 R11.1 TP4.1 U2.1 | length 381.4
  Top Layer w10: v1(-399.64,630.02) ccw(c-381.16,611.54) -406.9,616.06 ccw(c-381.16,611.54) -407.29,611.54 -407.29,587.01 -408.47,500.6 -408.47,466.02 ccw(c-382.98,466.02) v2(-401,448) -398.65,445.65 ccw(c-350,494.31) v1@-350,425.5
  Bottom Layer w10: R10.2 ccw(c-409.04,619.54) -400.5,619.54 v1@-400.5,630.02 ; R11.1 v1@-400.5,630.02 ; v1(-399.64,630.02) v1@-400.5,630.02 ; v1@-349.99,425.5 -332.49,425.5 cw(c-332.49,405.01) -318.2,419.7 cw(c-332.49,405.01) R1.2 cw(c-288.75,390.25) -288.75,431.61 U2.1
  other v1: -346.99,425.47
RECT: R15.2 R17.1 U3.14 | length 454.3
  Top Layer w6: -39.4,699.88 -18.54,699.88 ccw(c-18.54,715.76) -18.43,699.88 ccw(c-18.54,715.76) -15.95,700.09 ccw(c-16.96,706.01) -14.65,700.47 cw(c-6.52,681.31) -12.74,701.17 ccw(c-14.58,706.88) -10.5,702.49 9.14,720.98
  Top Layer w8: v1(-153,637) -129.94,637 ccw(c-129.94,701.49) -121.69,637.53 -59.34,699.88 -39.4,699.88 ; 9.14,720.98 25.6,737.44 v1(25.6,817.31)
  Bottom Layer w8: R17.1 24,815.71 v1(25.6,817.31)
  Bottom Layer w10: v1(-153,637) ccw(c-117.34,672.66) -117.34,622.23 U3.14 -40.19,622.23 cw(c-40.19,587.31) R15.2
REF: P1.3 R13.1 | length 251.7
  Top Layer w20: P1.3@-316.98,533.76 P1.3 -214.96,504.29 cw(c-285.67,575) P1.3@-285.67,475
  other v1: -380,506
REF#: R13.2 R14.1 U2.3 | length 758.6
  Top Layer w10: v1(-112,387) -0.14,387 ccw(c-0.14,421.14) 24,397 ccw(c-4.97,425.97) 36,425.97 36,673.31 ccw(c2.5,673.31) v1(26.19,697)
  Bottom Layer w10: R13.2@-318,532.59 cw(c-314.59,532.59) R13.2 -317,501.07 ccw(c-301.98,501.07) -312.6,490.45 ccw(c-294.13,508.92) -294.13,482.8 U2.3 -225.16,482.8 cw(c-225.16,469.84) -216,479 cw(c-228.07,466.93) -211,466.93 ccw(c-138.75,466.93) -189.84,415.84 -187,413 ccw(c-124.23,475.77) -124.23,387 v1(-112,387) ; R14.1 cw(c25.12,690) 22.56,692.56 27,697 v1(26.19,697)
VOUT: C4.1 C6.1 R6.2 U1.8 | length 283.1
  Top Layer w15: v1(-420,321) -406.29,334.71 cw(c-335.58,264) -335.58,364 v1(-288,364)
  Bottom Layer w10: C6.1@-390.21,321 cw(c-390.21,319.29) C6.1 cw(c-387.79,319.29) C6.1@-387.79,321
  Bottom Layer w15: v1(-420,321) C6.1@-390.21,321 ; C6.1@-387.79,321 R6.2 ; C4.1 cw(c-305.84,350.34) -305.84,364 v1(-288,364) -280.36,356.36 ccw(c-253.87,382.86) -259.17,345.76 U1.8

## Other copper
Bottom Layer:
  region net NetD1_1: -108,64 -108,112.72 -175,112.72 -175,64
  rectangle net NetD1_1: -218.85,-3.29 -158.85,113
  rectangle net GND: -282.25,500.51 -212,526
  region net REF: -362,494 -362,552.5 -398.5,552.5 -398.5,494
  region net +5V: -41.89,331.83 -41.89,443.5 -68.39,443.5 -68.39,331.83
  rectangle net +5V: -142.52,416.5 -42.04,443
  rectangle net +5V: -297,75.28 -233,212
  rectangle net +5V: -373.5,686.5 -333.01,713
  rectangle net GND: -407.5,686.5 -384,736.5
  rectangle net +5V: -367.75,192 -198.75,232
  rectangle net +5V: -399,230 -263.79,264.5
  rectangle net GND: -66.5,451.9 0.1,480.5
  rectangle net NetC5_2: -142.52,497.5 36.5,518.26
  rectangle net REF#: 12.5,677.5 37.5,715
  region net NetR14_2: 30.5,616.69 -0.5,616.69 -0.5,592.69 30.5,592.69
  region net NetR14_2: 21.5,625.69 -0.5,625.69 -0.5,613.19 21.5,613.19
  rectangle net NetR14_2: -15.5,690 6.5,702.5
  rectangle net NetR14_2: -24.5,669.5 6.5,693.5
  region net GND: -139,277.5 -177.66,277.5 -177.66,200.5 -139,200.5
  region net +5V: -199,277.5 -284,277.5 -284,200.5 -199,200.5
  region net +5V: -199.36,257.78 -199.36,277.28 -283.37,277.28 -283.37,257.78
  region net GND: -85,257.78 -85,277.28 -169,277.28 -169,257.78
  rectangle net ENV: -101.91,767.7 -40.1,800.22
  region net NetD2_1: -226.51,855.72 -276.48,855.72 -276.48,767.7 -226.51,767.7
  region net NetR7_1: -266.09,639.75 -266.09,655.89 -360.09,655.89 -360.09,639.75
  region net NetR7_1: -351.24,661.5 -377.24,661.5 -377.24,604.5 -351.24,604.5
  region net RAW-OUTPUT: -389.24,661.5 -413.24,661.5 -413.24,604.5 -389.24,604.5
  region net NetR7_2: -317.5,565.87 -317.5,585.37 -376.5,585.37 -376.5,565.87
  rectangle net NetR7_2: -337,566.5 -317.5,630.3
  rectangle net "OUT B": -142.52,449.33 -86.62,490.67
  rectangle net NetR19_3: -416.49,836.5 -363.5,923.53

## Silkscreen, mask and mechanical layers (free items; w line width, h text height)
Top Overlay:
  text "MID" at -256.5,1132.98 h32
  text "REF" at -341.25,410.54 h42
  text "END" at -256.5,-94.48 h32
Bottom Overlay:
  drawing of 2573 lines, arcs and shapes, not listed
  text "Measure#" at -287,474 h35
  text "MEASURE" at 64.97,83.16 h38
  text "VIN" at -346.64,82.16 h45
  text "Measure" at -21.62,-54 h35
  text "GND" at -241,-60.46 h45
  text "5V" at -165.5,-60.46 h45
Board Outline:
  lines w10: -440.49,104.27 ccw(c-243.65,102.06) -245.86,-94.78 -124.63,-94.78 ccw(c-126.84,102.06) 70,104.27 70,965 ccw(c-126.84,967.21) -124.63,1164.05 -245.86,1164.05 ccw(c-243.65,967.21) -440.49,965 ; -440.49,104.27 -440.49,965 ; -440.49,104.27 -440.49,965
Fabrication:
  drawing of 191 lines, arcs and shapes, not listed
  text "Layer" at 1167.34,561 h60
  text "Name" at 1577.26,561 h60
  text "Material" at 2507,561 h60
  text "Thickness" at 3366.77,561 h60
  text "Constant" at 4016.6,561 h60
  text "Board Layer Stack" at 4586.46,561 h60
  text "Top Overlay" at 1577.26,441 h60
  text "Top Solder" at 1577.26,321 h60
  text "Solder Resist" at 2507,321 h60
  text "3.00mil" at 3366.77,321 h60
  text "3.5" at 4016.6,321 h60
  text "1" at 1167.34,201 h60
  text "Top Layer" at 1577.26,201 h60
  text "9.00mil" at 3366.77,201 h60
  text "Dielectric 1" at 1577.26,81 h60
  text "FR-4" at 2507,81 h60
  text "16.00mil" at 3366.77,81 h60
  text "4.8" at 4016.6,81 h60
  text "2" at 1167.34,-39 h60
  text "Bottom Layer" at 1577.26,-39 h60
  text "9.00mil" at 3366.77,-39 h60
  text "Bottom Solder" at 1577.26,-159 h60
  text "Solder Resist" at 2507,-159 h60
  text "3.00mil" at 3366.77,-159 h60
  text "3.5" at 4016.6,-159 h60
  text "Bottom Overlay" at 1577.26,-279 h60
  text "Total board thickness:" at 1167.34,-399 h60
  text "40.00mil" at 3366.77,-399 h60
Drill Drawing:
  lines w10: 1171.82,1080.17 1188.49,1080.17 1205.15,1063.5 1221.82,1080.17 1238.49,1080.17 1221.82,1096.83 1238.49,1113.5 1221.82,1113.5 1205.15,1130.17 1188.49,1113.5 1171.82,1113.5 1188.49,1096.83 1171.82,1080.17 ; 1171.82,1213.5 1238.49,1213.5 1238.49,1280.17 1171.82,1280.17 1171.82,1213.5
  lines w15: 1112.03,1018.5 10285.51,1018.5 ; 1112.03,1318.5 10285.51,1318.5 ; 1662.9,868.5 1662.9,1468.5 ; 2202.76,868.5 2202.76,1468.5 ; 3292.45,868.5 3292.45,1468.5 ; 3798.32,868.5 3798.32,1468.5 ; 4532.12,868.5 4532.12,1468.5 ; 6031.67,868.5 6031.67,1468.5 ; 6621.52,868.5 6621.52,1468.5 ; 7367.32,868.5 7367.32,1468.5 ; 8017.15,868.5 8017.15,1468.5 ; 8882.91,868.5 8882.91,1468.5 ; 1112.03,868.5 10285.51,868.5 10285.51,1468.5 1112.03,1468.5 1112.03,868.5
  text "Symbol" at 1202.03,1363.5 h72
  text "Count" at 1707.9,1363.5 h72
  text "Hole Size" at 2247.76,1363.5 h72
  text "Plated" at 3337.45,1363.5 h72
  text "Hole Type" at 3843.32,1363.5 h72
  text "Drill Layer Pair" at 4577.12,1363.5 h72
  text "Via/Pad" at 6076.67,1363.5 h72
  text "Pad Shape" at 6666.52,1363.5 h72
  text "Template" at 7412.32,1363.5 h72
  text "Hole Length" at 8062.15,1363.5 h72
  text "Routed Path Length" at 8927.91,1363.5 h72
  text "31" at 1707.9,1213.5 h60
  text "11.81mil (0.300mm)" at 2247.76,1213.5 h60
  text "PTH" at 3337.45,1213.5 h60
  text "Round" at 3843.32,1213.5 h60
  text "Top Layer - Bottom Layer" at 4577.12,1213.5 h60
  text "Via" at 6076.67,1213.5 h60
  text "Rounded" at 6666.52,1213.5 h60
  text "(Mixed)" at 7412.32,1213.5 h60
  text "-" at 8062.15,1213.5 h60
  text "-" at 8927.91,1213.5 h60
  text "2" at 1707.9,1063.5 h60
  text "39.37mil (1.000mm)" at 2247.76,1063.5 h60
  text "NPTH" at 3337.45,1063.5 h60
  text "Round" at 3843.32,1063.5 h60
  text "Top Layer - Bottom Layer" at 4577.12,1063.5 h60
  text "Pad" at 6076.67,1063.5 h60
  text "Rounded" at 6666.52,1063.5 h60
  text "c0hn100" at 7412.32,1063.5 h60
  text "-" at 8062.15,1063.5 h60
  text "-" at 8927.91,1063.5 h60
  text "33 Total" at 1707.9,913.5 h60

## Dimensions
70,965 to -440.49,965 on Dimension
-124.63,-94.78 to -245.86,1164.05 on Dimension
-126.84,102.06 to -126.84,102.06 on Dimension
-243.65,102.06 to -243.65,102.06 on Dimension
-126.84,967.21 to -126.84,967.21 on Dimension
-243.65,967.21 to -243.65,967.21 on Dimension
70,965 to 70,104.27 on Dimension
-440.49,965 to -440.49,104.27 on Dimension